# Altium PCB PCB.PcbDoc (part 8 of 9)
Units mil, origin at the board's own origin, x right, y up, seen from the top; angles counter-clockwise.
Board outline 4330.71 x 3149.61 mil, 8 copper layers (L1_TOP, L2_GND, L3_SIG, L4_PWR, L5_PWR, L6_SIG, L7_GND, L8_BOT), stack 62.406 mil thick; 660 components, 433 nets, 2602 pads, 1254 vias.
Unrouted connection lines stored in the file: 930.
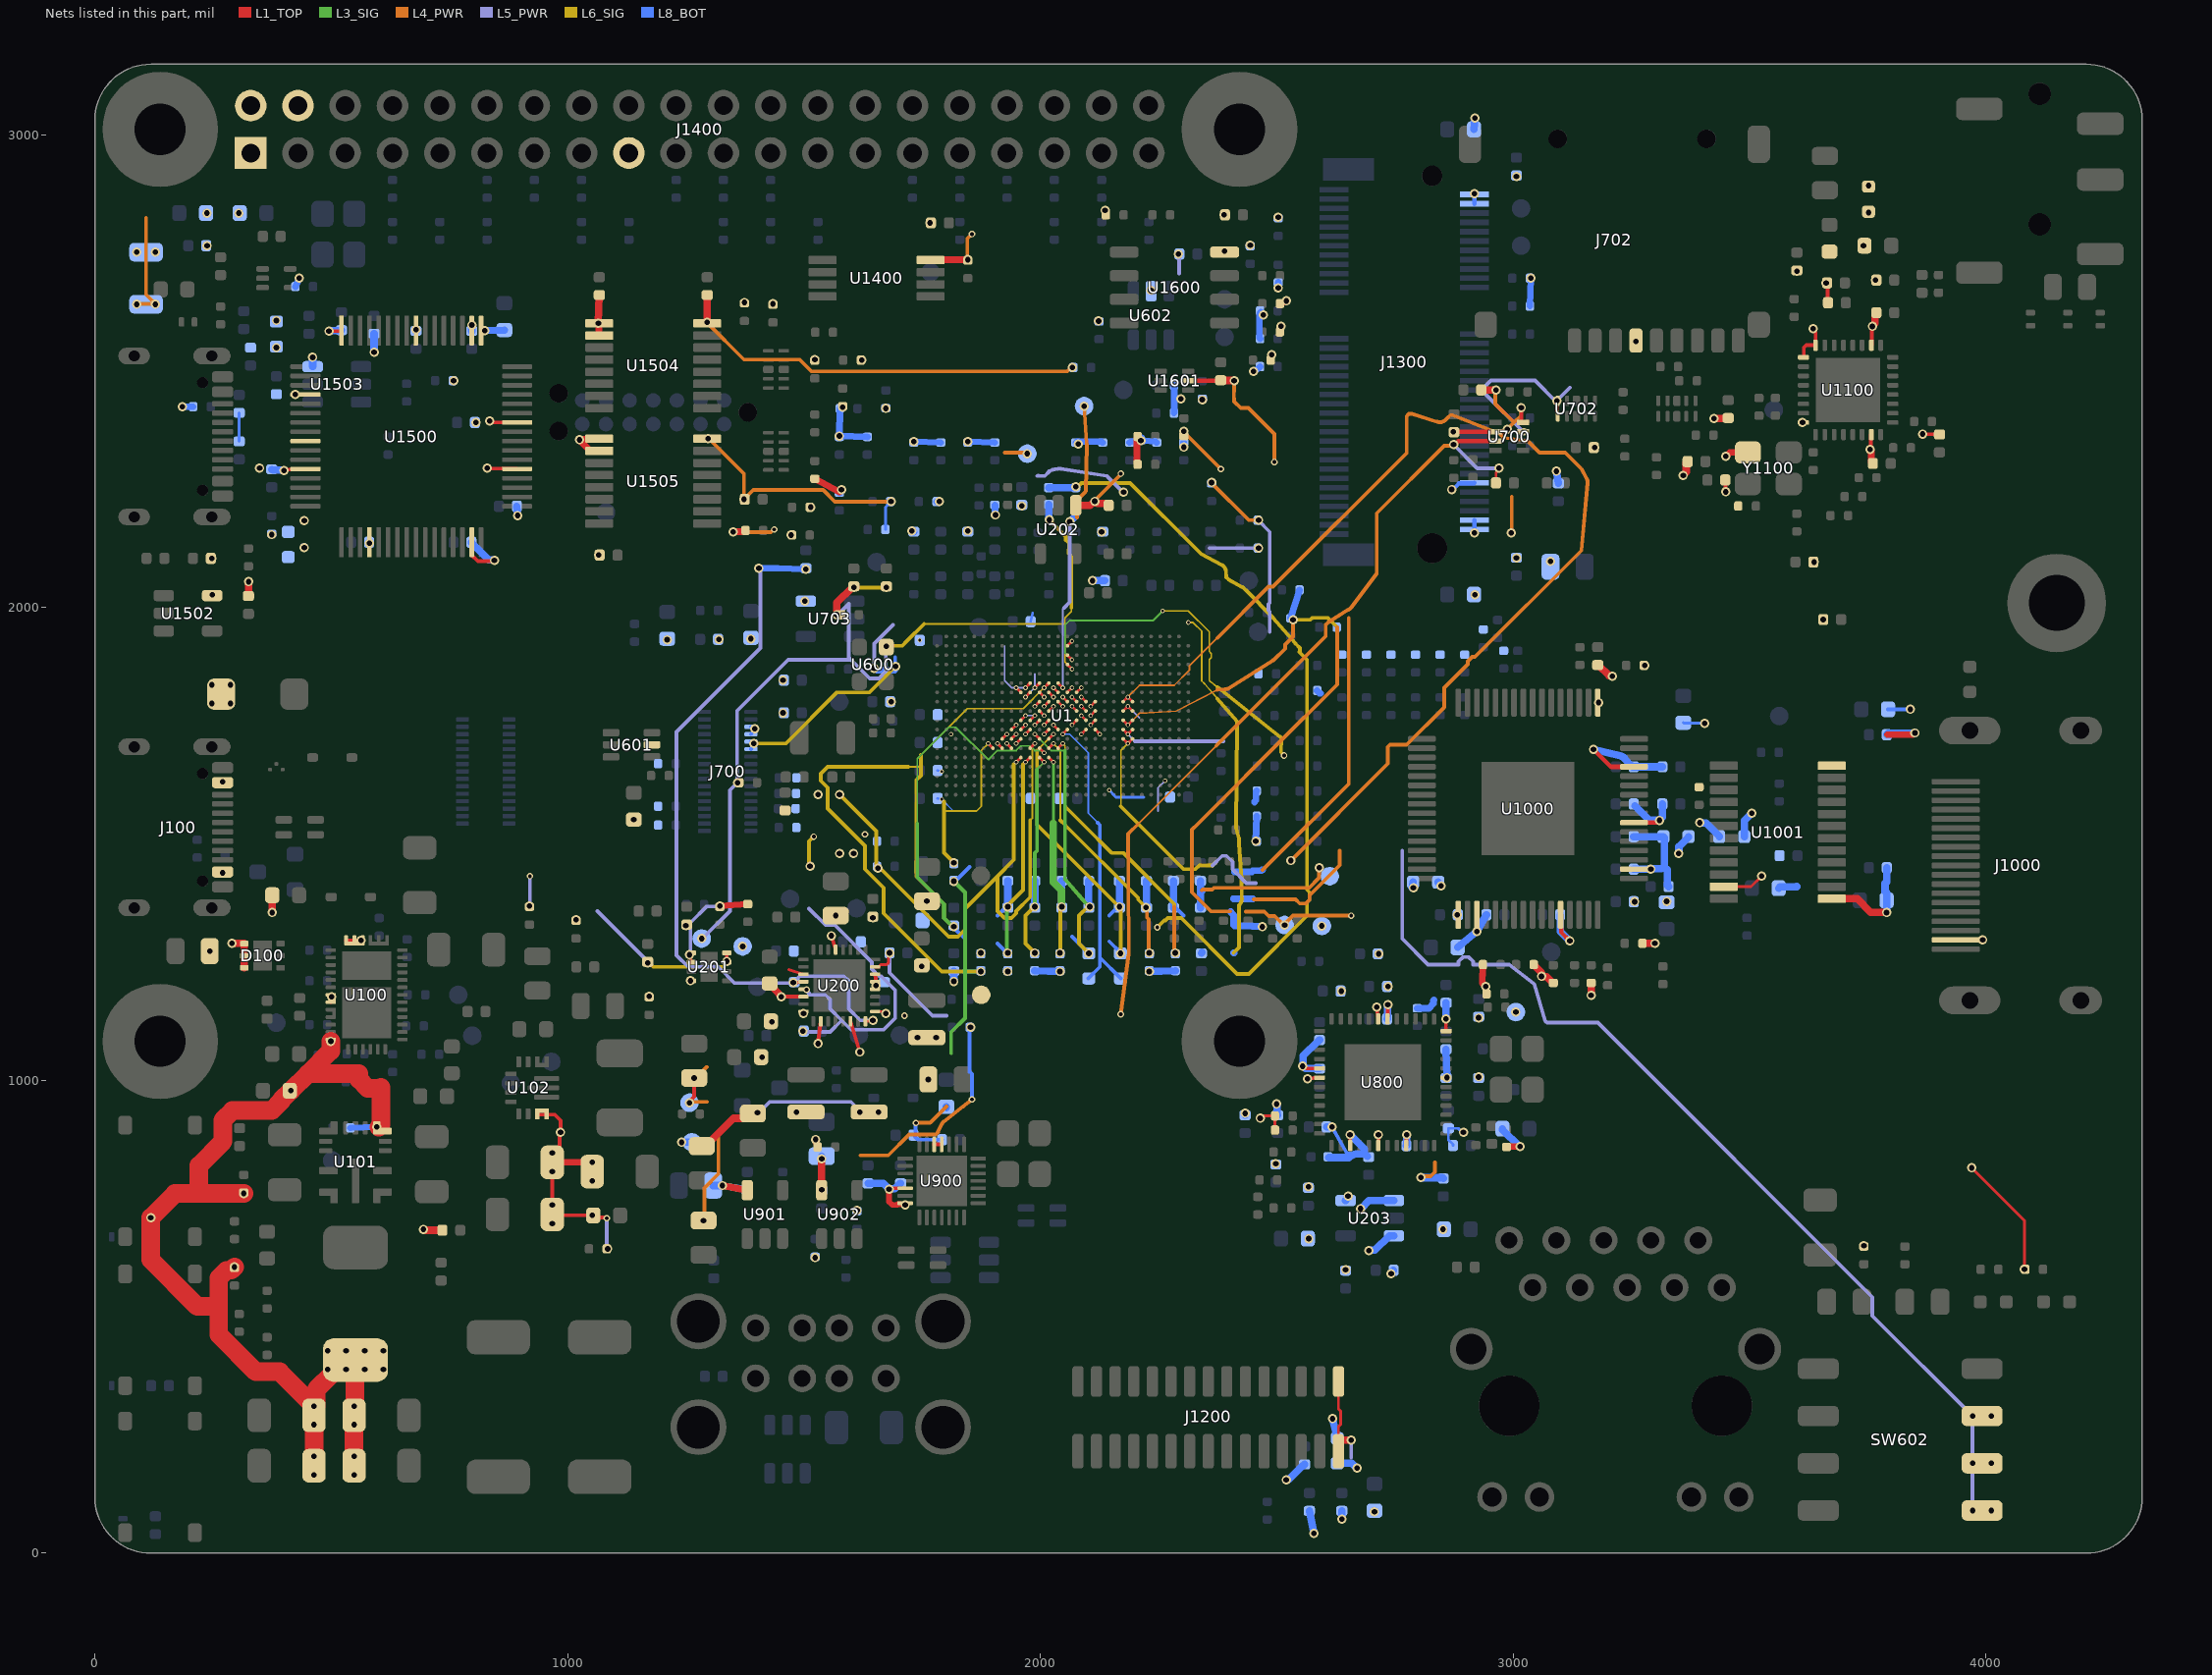
[diagram p11: the nets of this part, all layers, seen from the top]

## Via types
v1: diameter 19.68, hole 11.81, L1_TOP to L8_BOT, 865 vias
v2: diameter 9.84, hole 5.91, L1_TOP to L8_BOT, 246 vias
v3: diameter 15.75, hole 7.87, L1_TOP to L8_BOT, 125 vias
v4: diameter 13.78, hole 7.87, L1_TOP to L8_BOT, 18 vias

## Nets (pads, with @x,y where several pads share a name; then routed paths per layer and width w, separated by ;. In a path a pad name is that pad's centre, name@x,y a point inside that pad or via, vN(x,y) a via of type N, cw(c..) or ccw(c..) an arc to the next point about the centre after c; other vN are vias at no path point) (continued)
VBUS_USBC: C100.1 C101.1 D100.4 D100.5 D100.6 D103.2 J100.A4B9 J100.B4A9 R902.1 U100.23 U100.24 U100.25 U100.32 U100.33 | length 211.7
  L1_TOP w7.87: U100.33@499.02,1165.35 v1(500.98,1177.17) ; U100.32@499.02,1181.1 v1(500.98,1177.17) ; U100.32@505.91,1173.23 v1(500.98,1177.17) ; U100.25@531.5,1296.26 v1(562.99,1296.26) ; U100.24@549.21,1289.37 v1(562.99,1296.26) ; U100.24@549.21,1296.26 v1(562.99,1296.26) ; U100.23@566.93,1296.26 v1(562.99,1296.26)
  L1_TOP w15.75: v1(270.08,1438.98) J100.B4A9@270.08,1440.94 ; J100.A4B9@270.08,1629.92 v1(270.08,1631.89) ; v1(290,1290) 290.31,1289.69 315.63,1289.69 D100.4@315.95,1289.37 D100.6@315.95,1238.19 ; v1(375,1355) 375.1,1355.1 375.1,1391.63 C101.1@375.2,1391.73
  L8_BOT w14.17: v1(270.08,1438.98) R902.1@275.59,1441.93
  other v1: 242.91,1273.62 247.44,1797.24 286.81,1797.24 247.44,1836.61 286.81,1836.61
VCC_3V3_CAM: C1200.1 C1201.1 C1202.1 FB1200.2 J1200.15 | length 324.1
  L1_TOP w5.94: J1200.15@2630.59,215.43 2630.59,267.89 2634.86,272.16 2634.86,300.84 2630.59,305.1 J1200.15@2630.59,363.07
  L1_TOP w15.75: J1200.15@2637.8,239.17 v1(2657.48,239.17)
  L5_PWR w7.87: 2657.48,201.77 v1@2657.48,241.14
  L8_BOT w15.75: C1201.1@2568.9,89.37 v1(2578.74,42.13) ; FB1200.2@2627.95,189.96 2658.97,189.96 2668.93,180 v1(2670,180) ; v1(2637.8,71.85) C1202.1@2637.8,89.37 ; v1(2706.69,87.8) C1200.1@2706.69,89.76
VCC_3V3_DBG: C1504.1 C1505.1 C1510.1 C1511.1 C1512.1 C1513.1 C1514.1 C1521.1 C1522.1 C1524.1 FB1500.1 FB1501.1 R1504.1 R1505.1 R1508.1 R1509.1 R1510.1 U1500.20 U1500.31 U1500.42 U1500.50 U1500.56 U1502.5 U1503.6 U1504.1 U1504.2 U1505.1 U1505.2 | length 570.2
  L1_TOP w7.87: v1(580.71,2136.34) U1500.20@580.71,2138.29 ; U1500.56@679.13,2586.12 v1(679.13,2588.07) ; U1500.31@797.24,2138.29 797.24,2111.22 810.04,2098.43 843.43,2098.43 v1(845,2100) ; U1500.50@797.24,2586.12 v1(797.24,2597.91) ; v1(835,2395) 838.2,2395 841.46,2391.73 U1500.42@893.21,2391.73
  L1_TOP w14.17: U1505.2@1066.93,2331.69 1046.71,2333.29 1044.66,2333.29 1044.49,2333.47 1044.49,2335.51 v1(1025,2355) 1026.05,2356.05 1065.7,2356.05 U1505.1@1066.93,2357.28 ; U1504.2@1066.93,2575.79 v1(1064.96,2601.38) U1504.1@1066.93,2601.38 ; R1505.1@1374.02,2643.7 v1(1374.02,2645.67)
  L1_TOP w15.75: C1505.1@245.28,2104.33 v1(247.24,2104.33) ; U1502.5@248.03,2025.59 v1(248.03,2027.56) ; C1504.1@324.8,2024.8 324.9,2024.9 324.9,2054.9 v1(325,2055) ; v1(1064.96,2601.38) C1522.1@1066.93,2661.22 ; v1(1065.75,2111.22) C1524.1@1067.72,2111.22
  L8_BOT w14.17: v1(185,2425) 185.1,2425.1 207.58,2425.1 R1509.1@207.68,2425.2 ; v1(374.02,2154.53) R1504.1@374.02,2156.5 ; R1508.1@424.21,2679.13 v1(432.09,2696.85) ; R1510.1@756.89,2480.32 v1(758.86,2480.32)
  L8_BOT w15.75: FB1500.1@383.86,2605.31 v1(383.86,2607.28) ; v1(442.91,2126.97) v1@442.91,2128.94 ; U1503.6@460.63,2509.84 v1(460.63,2529.53) ; C1511.1@579.92,2138.27 v1(580.71,2136.34) ; v1(590.55,2540.16) C1521.1@590.55,2579.53 ; C1514.1@679.13,2585.35 v1(679.13,2588.07) ; C1512.1@796.46,2138.27 796.46,2137.09 832.79,2100.75 844.25,2100.75 v1(845,2100) ; C1510.1@797.24,2585.35 v1(797.24,2597.91) ; C1513.1@803.86,2391.73 v1(805.83,2391.73)
VCC_3V3_FTPHY: C1515.1 C1516.1 FB1500.2 U1500.4 | length 21.7
  L1_TOP w7.87: v1(423.7,2450.79) U1500.4@445.37,2450.79
  other v1: 383.86,2550.2
VCC_3V3_FTPLL: C1517.1 C1518.1 FB1501.2 U1500.9 | length 60.6
  L8_BOT w5.91: C1518.1@305.12,2351.57 C1517.1@305.12,2412.2
  other v1: 442.91,2184.06 348.43,2295
VCC_3V3_MAIN: C104.1 C114.1 C117.1 C118.1 C119.1 C120.1 C200.1 C201.1 C202.1 C203.1 C204.1 C205.1 C207.1 C209.1 C222.1 L100.2 R117.1 R119.1 R120.1 R121.1 R122.1 R200.1 R201.1 R205.1 R209.1 TP302.1 U100.38 U101.1 U200.4 U200.5 U200.6 U200.13 U200.22 U200.26 U200.30 U201.1 U201.2 U201.4 | length 2694.6
  L1_TOP w5.91: U200.4@1650.59,1192.91 v1(1652.56,1200.79)
  L1_TOP w7.87: v1(1259.84,1210.63) U201.4@1261.81,1210.63 ; U201.2@1261.81,1250 v1(1257.87,1265.75) U201.1@1261.81,1269.68 ; v1(1451.77,1177.17) U200.22@1499.02,1177.16 ; v1(1529.53,1077.76) U200.26@1535.43,1125 ; v1(1557.7,1306.1) U200.13@1566.93,1276.57 ; U200.30@1598.43,1125 v1(1618.11,1060.04) ; U200.5@1650.59,1208.66 v1(1652.56,1200.79) U200.6@1650.59,1224.41
  L1_TOP w14.17: R122.1@1017.72,1337.6 v1(1017.72,1339.57) ; R121.1@1172.24,1176.18 v1(1172.24,1178.15) ; R201.1@1321.85,1367.13 v1(1321.85,1369.09) R205.1@1380.91,1373.03 ; v1(1524.61,875) R209.1@1528.54,859.25
  L1_TOP w15.75: v1(695,685) 696.07,685 697.99,683.07 C114.1@735.04,683.07 ; v1(1250,1327.56) C222.1@1251.97,1329.53 ; C207.1@1409.25,1049.21 v1(1411.22,1049.21) ; C203.1@1427.16,1204.92 v1(1451.77,1177.17) ; C202.1@1429.92,1125 1430.91,1124.02 v1(1431.89,1124.02) ; v1(1645.67,1344.29) C204.1@1645.67,1346.26 ; v1(1749.02,1241.34) C200.1@1749.02,1243.31
  L1_TOP w39.37: v1(295.28,605.32) 288.39,598.43 278.24,598.43 261.81,581.99 261.81,522.15 ; v1(314.96,760.83) 220,760.83 ; C119.1@463.58,185.04 v1(463.58,271.65) ; v1(463.58,311.02) 390.75,383.86 340.25,383.86 261.81,462.3 261.81,522.15 ; C117.1@468.5,311.02 468.5,346.56 L100.2@501.42,379.48 ; v1(499.02,1082.68) 499.02,1062.51 450.75,1014.25 ; C120.1@548.23,185.04 v1(548.23,271.65) ; C118.1@548.23,291.34 549.7,292.82 549.7,406.99 L100.2@551.18,408.46 ; U101.1@600.39,901.57 605,906.18 605,985.46 603.05,983.5 576.95,983.5 558.5,1001.95 558.5,1014.25 450.75,1014.25 ; 220,760.83 169.29,760.83 v1(118.11,709.65) 118.11,620.52 216.49,522.15 261.81,522.15 ; 220,760.83 220,820 270.67,870.67 270.67,916.12 290.71,936.17 374.05,936.17 394.09,956.21 394.09,958.27 v1(414.17,978.35) 414.85,978.35 450.75,1014.25
  L5_PWR w7.87: v1@1259.84,1264.76 1259.84,1333.66 1294.29,1368.11 v1@1323.82,1368.11
  L8_BOT w14.17: R200.1@118.11,707.68 v1(118.11,709.65) ; R120.1@540.35,899.61 v1(596.46,901.57)
  L8_BOT w15.75: v1(1241.14,869.09) TP302.1@1262.8,869.09
  other v1: 463.58,165.35 548.23,165.35 463.58,204.72 548.23,204.72 548.23,311.02 492.13,388.78 531.5,388.78 570.87,388.78 610.24,388.78 492.13,428.15 531.5,428.15 570.87,428.15 610.24,428.15 1566.93,1348.62
  other v4: 1712.6,1136.81
VCC_3V3_SYS: C223.1 C224.1 C225.1 C608.1 C700.1 C701.1 C710.1 C712.1 C803.1 C804.1 C805.1 C806.1 C807.1 C808.1 C809.1 C810.1 C900.1 C901.1 C902.1 C903.1 C904.1 C1015.1 C1016.1 C1107.1 C1108.1 C1114.1 C1115.1 C1203.1 C1300.1 C1301.1 C1302.1 C1303.1 C1304.1 C1404.1 C1406.1 C1407.1 C1523.1 C1525.1 C1600.1 C1601.1 FB311.1 FB1000.1 FB1001.1 FB1002.1 FB1100.1 FB1200.1 J700.22 J700.23 J1300.2 J1300.4 J1300.72 J1300.74 J1400.1 J1400.17 R108.1 R202.1 R204.1 R208.1 R210.1 R604.1 R607.1 R608.1 R609.1 R610.1 R620.1 R622.1 R624.1 R626.1 R628.1 R630.1 R632.1 R634.1 R636.1 R638.1 R640.1 R642.1 R651.1 R731.1 R813.1 R814.1 R820.1 R822.1 R908.1 R909.1 R1002.1 R1007.1 R1012.1 R1013.1 R1014.1 R1015.1 R1016.1 R1100.1 R1101.1 R1106.1 R1200.1 R1201.1 R1428.1 R1429.1 R1430.1 R1431.1 R1432.1 R1433.1 R1511.1 R1512.1 R1513.1 R1514.1 R1515.1 R1516.1 R1517.1 R1518.1 R1522.1 R1523.1 R1524.1 R1525.1 R1526.1 R1527.1 R1529.1 R1600.1 R1603.1 R1604.1 R1605.1 R1606.1 R1607.1 SW602.1 SW602.2 SW602.3 TP303.1 U1.B15 U1.F11 U1.F12 U1.G10 U1.G11 U1.J21 U1.J22 U1.L21 U1.L22 U1.M21 U1.M22 U201.7 U201.8 U202.1 U602.5 U700.2 U700.8 U800.19 U800.30 U800.41 U900.18 U900.19 U900.26 U900.28 U1001.24 U1100.7 U1400.8 U1504.16 U1505.16 U1600.8 U1601.5 Y1100.4 | length 12359.6
  L1_TOP w5.91: v2(1948.82,1830.71) U1.G10@1958.66,1820.87 ; v2(1968.5,1811.02) U1.G11@1978.35,1820.87 ; v2(1968.5,1830.71) U1.F11@1978.35,1840.55 ; v2(1988.19,1830.71) U1.F12@1998.03,1840.55 ; U1.B15@2057.09,1919.29 v2(2066.93,1929.13) ; U1.M21@2175.2,1722.44 v2(2185.04,1712.6) U1.M22@2194.88,1722.44 ; U1.L21@2175.2,1742.13 v2(2185.04,1732.28) U1.L22@2194.88,1742.13 ; U1.J21@2175.2,1781.5 v2(2185.04,1791.34) U1.J22@2194.88,1781.5 ; v1(2465,920) 2468.73,920 2473.73,925 R814.1@2496.3,925 R822.1@2496.3,895
  L1_TOP w7.56: v1(2555,1030) 2558.28,1030 2562.69,1025.59 U800.41@2590.55,1025.59 ; U800.30@2734.25,1129.92 2735,1137.95 v1(2735,1160) ; U800.19@2858.27,1005.91 v1(2860.24,1005.91)
  L1_TOP w7.87: U201.7@1336.61,1250 v1(1336.61,1251.97) U201.8@1336.61,1269.68 ; v1(1680,770) 1681.65,771.65 U900.26@1714.08,771.65 ; U900.19@1775.59,864.67 U900.18@1791.34,864.67 ; v1(3017.32,2423.23) 3017.32,2393.7 3019.29,2391.73 U700.8@3021.26,2391.73 ; v1(3755,2335) 3756.89,2336.89 3756.89,2365.16 U1100.7@3757.87,2366.14 ; v1(3866.14,2367.32) 3866.61,2366.85 3901.5,2366.85 C1108.1@3901.97,2366.38
  L1_TOP w9.45: U1601.5@2312.6,2480.32 2380.71,2480.32 C1601.1@2381.5,2481.1 ; v1(2873.62,2372.05) U700.2@2962.99,2372.05 2964.17,2373.23 2980.69,2373.23 2984.69,2377.23 v1(2987.46,2377.23)
  L1_TOP w12: v1(1680,770) 1680,743.54 1687.03,736.51 1696.97,736.51 1698.56,738.09 U900.28@1703.84,738.09
  L1_TOP w14.17: U1505.16@1295.28,2357.28 v1(1297.24,2357.28) ; U1504.16@1295.28,2601.38 v1(1295.28,2603.35) ; v1(1350,2160) 1351.05,2161.05 1374.53,2161.05 1376.3,2162.83 R1525.1@1376.3,2163.39 ; R1526.1@1434.37,2640.75 v1(1434.37,2642.72) ; v1(1472.76,2153.54) R1522.1@1474.72,2153.54 ; R1524.1@1512.13,2212.6 v1(1514.09,2212.6) ; R1523.1@1522.95,2272.64 1574.8,2245.08 v1(1579.19,2249.47) ; R1527.1@1522.95,2522.64 v1(1522.95,2524.61) ; v1(1582.01,2424.21) R1529.1@1582.01,2426.18 ; R604.1@1620.39,2523.62 v1(1622.36,2523.62) ; U1400.8@1767.72,2735.24 1768.7,2736.22 v1(1846.46,2736.22) ; v1(2136.81,2840.75) R1600.1@2138.78,2830.91 ; R1101.1@2205.71,2303.15 2204.05,2305.91 R1100.1@2204.05,2352.93 ; R1100.1@2205.71,2362.2 2204.05,2359.45 R1100.1@2204.05,2352.93 ; v1(2212.72,2353.22) R1100.1@2204.05,2352.93 ; R1604.1@2303.54,2363.19 v1(2303.54,2373.03) ; R1606.1@2487.2,2523.43 v1(2489.17,2535.24) ; R1605.1@2506.89,2583.27 v1(2508.86,2595.08) ; R1603.1@2506.89,2643.11 v1(2520.67,2649.02) ; R1014.1@2936.3,1245 2936.17,1242.24 2934.82,1212.42 2934.82,1206.61 v1(2941.93,1198.82) R1012.1@2943.9,1183.07 ; R813.1@2986.22,859.25 2986.97,860 v1(3015,860) ; R1013.1@3276.57,1877.95 v1(3278.54,1877.95) ; v1(3450,2320) 3458.46,2328.46 Y1100.4@3496.69,2328.46 ; R1607.1@3742.13,648.62 v1(3742.13,650.59) ; v1(3755,2335) 3755,2333.51 3757.56,2330.95 3757.56,2308.54 C1107.1@3761.1,2305 ; 3791.34,1731.3 3844.81,1731.3 3848.51,1735 v1(3850,1735)
  L1_TOP w15.75: v1(1169.29,1248.82) C224.1@1169.29,1250.79 ; v1(1295.28,2603.35) C1523.1@1295.28,2661.22 ; v1(1372.83,2229.33) C1525.1@1374.8,2229.33 ; v1(1766.54,2813.98) C1404.1@1768.5,2813.98 ; U202.1@2074.8,2216.54 2105.47,2216.54 2113.93,2225 2116.07,2225 2120.59,2220.47 2141.73,2220.47 2144.49,2217.72 C225.1@2144.49,2216.53 ; C1601.1@2381.5,2481.1 2382.05,2480.55 2409.45,2480.55 v1(2410,2480) ; v1(2388.58,2830.91) C1600.1@2390.55,2830.91 ; U1600.8@2389.76,2752.16 v1(2389.76,2754.13) ; C712.1@2932.68,2460.63 v1(2964.17,2460.63) ; R1015.1@3043.7,1245 3043.7,1244.02 3059.25,1228.47 3059.25,1220.75 v1(3060,1220) 3060.75,1219.25 3071.07,1219.25 3084.02,1206.3 R1016.1@3085,1206.3 ; v1(3165,1180) R1007.1@3165,1206.3 ; R1002.1@3273.7,1290 v1(3300,1290) ; C1115.1@3635.04,2096.46 v1(3637.01,2096.46) ; C1114.1@3654.13,1975 v1(3656.1,1975) ; FB1100.1@3751.97,2890.75 v1(3751.97,2892.72) ; v1@3866.14,2365.35 v1(3866.14,2367.32)
  L3_SIG w7.87: 1811.02,1058.07 1811.02,1102.36 1840.55,1131.89 1840.55,1397.64 v1@1815.94,1422.24
  L4_PWR w7.87: v1@1294.29,2603.35 1373.03,2524.61 1491.14,2524.61 1515.75,2500 2057.09,2500 v1@2066.93,2509.84 ; v1@1299.21,2357.28 1373.03,2283.46 1373.03,2229.33 1392.72,2249.02 1540.35,2249.02 1564.96,2224.41 v1@1683.07,2224.41 ; v1(1350,2160) 1430.06,2160 1435.41,2165.35 v4(1437.01,2165.35) ; v4(1736.81,910.04) 1737.2,910.43 1766.73,910.43 1801.18,944.88 ; v1@1845.47,2736.22 1845.47,2780.51 v4(1855.32,2790.35) ; v1(2115,2225) 2115,2226.59 2170.28,2281.87 v4(2170.28,2283.46) ; v1@2303.15,2372.05 v4(2381.89,2293.31) ; v1@2362.2,2263.78 2440.94,2185.04 v1@2460.63,2185.04 ; v1(2410,2480) 2410,2457.27 2409.25,2456.52 2409.25,2443.48 2410,2442.73 2410,2436.14 2423.71,2422.43 2439.77,2422.43 2495.08,2367.13 v4(2495.08,2308.07) ; 2434.76,1357.28 2473.85,1357.28 2473.85,1357.18 2483.07,1347.95 2495.55,1347.95 2514.76,1328.74 2534.45,1348.43 v4(2657.48,1348.43) ; 2450.79,1382.87 2539.76,1382.87 2548.38,1374.25 2561.52,1374.25 2569.25,1381.98 2569.25,1391.52 2632.87,1455.14 2632.87,1486.22 ; 2470,1445 2492.13,1467.13 2652.56,1627.56 2652.56,1978.35 ; v1@2962.6,2460.63 2962.6,2431.1 3001.97,2391.73 ; v1(2987.46,2377.23) 3001.97,2391.73 ; v1@3016.73,2421.26 3016.73,2406.5 3001.97,2391.73
  L5_PWR w3.54: 1924.21,1919.29 1924.21,1845.47 1938.98,1830.71 v2(1948.82,1830.71) v2(1968.5,1830.71) ; v2(1968.5,1811.02) v2(1988.19,1830.71) 1988.19,1860.24 ; v2(2185.04,1732.28) 2199.8,1717.52 ; v2(2185.04,1791.34) 2209.65,1766.73
  L5_PWR w7.87: 1062.99,1358.27 v1@1171.26,1250 ; v1@1648.62,1870.08 1648.62,1924.21 1687.99,1963.58 ; 1993.11,2278.54 1995.36,2279.44 1996.34,2278.47 2009.38,2278.47 2018.61,2287.69 2018.61,2288.75 2025.44,2291.48 cw(c2032.02,2275.04) 2030.15,2292.65 2035,2293.17 cw(c2040.71,2276.4) 2043.48,2293.9 2140.75,2278.54 2143.05,2276.24 v1@2175.2,2244.09 ; 2199.8,1717.52 2376.97,1717.52 2386.81,1717.52 ; 2293.31,2706.69 v1@2293.31,2746.06 ; 2357.28,2125.98 v1@2460.63,2125.98 ; 2364.3,1454.83 2384.33,1474.86 2393.92,1474.86 2406.5,1462.28 2406.5,1446.85 2436.02,1417.32 2455.71,1417.32 ; v1@2460.63,2185.04 2485.24,2160.43 2485.24,2118.11 2485.24,2009.56 2482.78,2007.11 2482.78,1994.06 2485.24,1991.6 2485.24,1948.82 ; 2765.75,1486.22 2765.75,1299.21 2819.88,1245.08 2884.25,1245.08 2884.25,1251.52 2893.48,1260.75 2906.52,1260.75 2915.75,1251.52 2915.75,1245.08 2992.13,1245.08 3042.44,1205.75 3042.81,1205.46 3044.55,1203.72 3068.07,1125.75 3069.47,1124.35 3071.78,1122.05 3179.13,1122.05 3759.84,541.34 3759.84,501.97 v1@3971.46,290.35 ; v1@4010.83,88.58 3971.46,88.58 v1@3971.46,191.93 ; v1@4010.83,191.93 v1@3971.46,191.93 ; v1@4010.83,290.35 v1@3971.46,290.35 ; v1@3971.46,191.93 v1@3971.46,290.35
  L6_SIG w3.54: 2170.28,1579.72 2170.28,1697.83 v2(2185.04,1712.6) ; v2(2312.99,1968.5) 2322.83,1968.5 2341.2,1950.14 2341.2,1845.13 2347.24,1839.1 cw(c2344.73,1836.59) 2347.32,1839 2347.52,1838.79 cw(c2344.93,1836.37) 2347.63,1838.67 2374.02,1808.07
  L6_SIG w7.87: v1@1171.26,1250 1181.1,1240.16 1328.74,1240.16 v1@1338.58,1250 ; v1@1392.72,1712.6 v1(1393.7,1712.6) 1461.61,1712.6 1569.88,1820.87 1638.78,1820.87 v1@1692.91,1875 ; 2170.28,1579.72 2303.15,1446.85 2328.14,1446.85 2336.12,1454.83 2364.3,1454.83 ; 2374.02,1808.07 2416.28,1759.06 2416.28,1752.87 2414.25,1535.15 ccw(c2430,1535) 2414.5,1532.23 ; 2408.46,1269.68 2420,1281.22 2420,1370.41 ccw(c2408.46,1383.86) 2426.18,1384.15 2425.5,1425.13 2425.49,1425.2 2420.03,1501.11 2420.05,1504.31 2420.37,1507.38 ccw(c2404.71,1509) 2419.71,1513.8 2415.37,1527.36 2414.5,1532.22
  L8_BOT w5.91: R210.1@1672.24,2165.35 1672.24,2212.78 1683.87,2224.41 v1(1684.06,2224.41)
  L8_BOT w7.87: J700.23@1387.8,1700.79 v1(1393.7,1712.6) J700.22@1387.8,1716.54 ; v1@1692.91,1875 1692.91,1894.68 ; C904.1@1731.5,883.9 1738.08,877.31 1738.52,877.31 1741.34,874.49 C903.1@1792.13,874.49 ; C904.1@1731.5,884.33 1735.68,888.52 1735.68,908.91 v4(1736.81,910.04) ; FB311.1@1815.94,1422.24 1816.93,1422.24 1820.87,1422.24 1850.39,1451.77 ; 2406.5,1382.87 2406.5,1387.8 ; C1016.1@3793.35,1785 v1(3840,1785)
  L8_BOT w9.45: v1(2918.5,2158.25) J1300.72@2918.5,2185.04 ; J1300.4@2918.5,2854.33 v1(2918.5,2875.98)
  L8_BOT w14.17: v1(1523.62,625) R908.1@1523.62,626.97 ; R610.1@1574.8,2243.11 1575.79,2243.11 1577.56,2244.88 1577.56,2246.34 1579.19,2247.98 v1(1579.19,2249.47) ; R1428.1@1574.8,2361.22 v1(1574.8,2363.19) ; R1430.1@1575.79,2421.26 v1(1574.8,2363.19) ; R909.1@1612.2,723.42 v1(1612.2,725.39) ; R1429.1@1633.86,2361.22 v1(1574.8,2363.19) ; v1(1648.62,1872.05) 1654.53,1868.11 1691.93,1868.11 v1(1693.9,1875.98) ; v1(1673.23,2421.58) R1431.1@1673.23,2422.24 ; R1515.1@1732.28,2349.41 v1(1732.28,2351.38) R1516.1@1789.37,2349.41 ; R108.1@1780.51,2224.41 v1(1786.57,2224.41) ; R1517.1@1846.46,2349.41 v1(1846.46,2351.38) R1518.1@1903.54,2349.41 ; v1(2067.91,2507.87) R608.1@2069.88,2507.87 ; R1511.1@2074.8,2349.41 2077.35,2351 R1511.1@2080.5,2351.18 ; v1(2080.32,2345.86) 2080.32,2351 R1511.1@2080.5,2351.18 ; v1(2123.13,2606.4) R607.1@2124.02,2605.31 ; R1512.1@2131.89,2349.41 2129.13,2351.18 R1511.1@2080.5,2351.18 ; R1513.1@2188.98,2349.41 2191.73,2351.18 v1(2212.72,2353.22) ; v1@2214.46,2358.96 v1(2212.72,2353.22) ; R1514.1@2246.06,2349.41 2243.31,2351.18 2219.28,2353.22 v1(2212.72,2353.22) ; R609.1@2282.48,2411.42 2283.51,2414.17 2283.51,2442.32 ; R202.1@2282.48,2470.47 2283.51,2467.72 2283.51,2442.32 ; v1(2296.88,2441.87) 2286.01,2441.87 2283.51,2442.32 ; v1(2303.15,2339.57) R1433.1@2303.15,2349.41 ; v1(2342.52,2439.96) R731.1@2342.52,2441.93 ; R1201.1@2362.2,2262.79 v1(2362.2,2264.76) ; 2408.46,1269.68 2410.43,1269.68 ; 2408.46,1383.86 2410.43,1383.86 2447.83,1383.86 2449.8,1383.86 ; 2410.43,1440.95 2447.83,1440.95 2447.83,1441.93 2449.61,1443.7 2467.21,1443.7 2468.51,1445 2470,1445 ; 2453.06,1588.25 2453.06,1589.74 2455.91,1592.59 2455.91,1610.43 R624.1@2457.68,1612.2 ; R620.1@2457.68,1505.91 v1(2455.71,1505.91) R622.1@2457.68,1559.05 ; R204.1@2459.65,2125.98 v1(2461.61,2125.98) ; R1200.1@2459.65,2185.04 v1(2461.61,2185.04) ; R651.1@2585.63,1824.8 2585.63,1823.82 2590.84,1818.61 R651.1@2592.3,1818.61 ; R820.1@2797.24,1152.56 2821.85,1152.56 2831.64,1162.35 2831.64,1169.26 2832.7,1170.32
  L8_BOT w15.75: C1407.1@235.43,2765.75 v1(237.4,2765.75) ; v1(304.33,2834.65) C1406.1@306.3,2834.65 ; v1(1210.63,1932.28) C700.1@1210.63,1934.25 ; C701.1@1318.11,1933.07 v1(1320.08,1933.07) ; C901.1@1635.35,782.28 1667.72,782.28 v1(1680,770) 1680.75,770.75 1691.54,770.75 1703.07,782.28 C900.1@1704.25,782.28 ; C902.1@1801.18,942.6 C902.1@1801.18,944.57 ; v1(1816.93,1421.26) 1816.93,1422.24 FB311.1@1816.93,1423.23 ; U602.5@2234.25,2669.29 v1(2234.25,2671.26) ; v1(2292.13,2748.03) C608.1@2294.09,2748.03 ; v1(2520,155) 2520.75,155.75 2525.83,155.75 2555.12,185.04 2556.3,185.04 C1203.1@2559.05,187.8 ; C810.1@2590.55,1024.8 2561.26,1024.8 2556.07,1030 v1(2555,1030) 2555.75,1030.75 2555.75,1051.82 2586.61,1082.68 2587.8,1082.68 C809.1@2590.55,1085.43 ; v1(2618.11,284.45) FB1200.1@2627.95,243.11 ; C808.1@2733.46,1129.92 2734.25,1130.7 2734.25,1159.25 v1(2735,1160) ; C807.1@2733.46,1198.82 v1(2735.43,1198.82) ; FB1000.1@2788.39,1419.29 2786.75,1407.81 2787.07,1407.48 v1(2789.05,1407.48) ; C806.1@2858.27,1005.12 v1(2860.24,1005.91) C805.1@2858.27,1065.75 ; C1303.1@2917.32,2027.56 v1(2919.29,2027.56) ; C1301.1@2917.32,3011.81 v1(2919.29,3035.43) ; C804.1@2927.16,1005.12 v1(2927.17,1007.09) ; C803.1@2977.56,897.64 2977.56,895.87 3013.43,860 v1(3015,860) ; v1(3007.09,2105.2) C1304.1@3007.09,2105.51 ; v1(3007.09,2912.2) C1302.1@3007.09,2914.17 ; v1(3350,1480) 3350.75,1480.75 3350.75,1494.45 3371.06,1514.76 FB1001.1@3371.06,1515.75 ; FB1002.1@3489.17,1515.75 3489.17,1549.17 v1(3505,1565) ; C1015.1@3790.55,1731.3 3790.55,1731.49 3793.31,1734.25 3849.25,1734.25 v1(3850,1735)
  other v1: 3972.44,90.16 4011.81,90.16 3972.44,190.16 4011.81,190.16 3972.44,290.16 4011.81,290.16 1714.09,736.22 3015,860 2516.73,1328.74 1140,1551.65 3078.98,2098.17 2176.18,2244.09
VCC_3V3_TFP_DVDD: C1000.1 C1001.1 C1002.1 C1003.1 C1004.1 FB1000.2 U1000.1 U1000.3 U1000.12 U1000.33 | length 312.2
  L1_TOP w9.45: v1(2881.89,1350.39) U1000.1@2883.86,1350.39 ; v1(2923.23,1314.96) U1000.3@2923.23,1350.39 ; U1000.12@3100.39,1350.39 3101.57,1349.21 3101.57,1313.43 v1(3120,1295) ; U1000.33@3179.13,1799.21 v1(3181.1,1799.21)
  L1_TOP w15.75: C1004.1@3179.13,1878.74 3180.32,1878.74 3203.3,1855.75 3209.25,1855.75 v1(3210,1855)
  L8_BOT w15.75: FB1000.2@2841.54,1419.29 2847.44,1411.42 2847.6,1411.42 v1(2847.68,1411.49) ; v1(2881.89,1350.39) C1001.1@2883.07,1350.39 ; C1000.1@2882.68,1281.5 v1(2923.23,1314.96) C1002.1@2943.7,1350.39 ; C1003.1@3099.61,1350.39 3099.61,1315.39 v1(3120,1295)
VCC_3V3_TFP_PVDD: C1005.1 C1006.1 C1007.1 C1008.1 C1009.1 FB1001.2 U1000.18 | length 279.8
  L1_TOP w9.45: U1000.18@3255.91,1446.85 v1(3291.34,1446.85)
  L8_BOT w15.75: C1008.1@3255.12,1377.95 v1(3257.09,1377.95) ; C1006.1@3255.12,1446.85 v1(3291.34,1446.85) 3292.09,1447.6 3314.26,1447.6 3319.07,1452.41 3320.13,1452.41 ; C1009.1@3255.12,1515.75 FB1001.2@3317.91,1515.75 3320.13,1513.53 3320.13,1452.41 ; C1005.1@3324.8,1376.77 v1(3324.8,1378.74) ; C1007.1@3328.9,1410 3326.14,1412.76 3326.14,1445.34 3320.13,1451.35 3320.13,1452.41
VCC_3V3_TFP_TVDD: C1010.1 C1011.1 C1012.1 C1013.1 C1014.1 FB1002.2 R1008.1 U1000.23 U1000.29 | length 515
  L1_TOP w9.45: v1(3170,1700) 3206.61,1663.39 U1000.29@3255.91,1663.39 ; U1000.23@3255.91,1545.28 3302.51,1545.28 3307.23,1550 v1(3310,1550)
  L8_BOT w5.91: C1010.1@3360,1756.65 3360.83,1755.83 3404.17,1755.83 v1(3405,1755)
  L8_BOT w15.75: v1(3170,1700) 3226.6,1686.54 cw(c3222.64,1669.88) 3235.43,1681.27 3243.14,1672.61 3252.36,1663.39 C1013.1@3255.12,1663.39 C1014.1@3315.75,1663.39 ; C1011.1@3257.87,1580.71 3287.83,1550.75 3309.25,1550.75 v1(3310,1550) 3310,1551.07 3315.75,1556.81 C1012.1@3315.75,1584.65 ; v1(3395,1545) 3395.75,1544.25 3408.51,1544.25 3436.02,1516.73 FB1002.2@3436.02,1515.75
VCC_5V0: C125.1 C126.1 C127.1 C128.1 C905.1 C906.1 C909.1 C910.1 C1017.1 C1018.1 F1400.1 R123.1 R125.1 R301.1 R910.1 R1610.1 TP301.1 U102.7 U102.8 U901.5 U902.5 U1001.11 | length 1683.3
  L1_TOP w5.91: U1001.11@3470,1410 3503.53,1410 v1(3525.88,1432.35) ; v1(3970,815) 4081.69,703.31 v1(4081.69,600.39)
  L1_TOP w7.87: U102.7@936.02,929.13 936.02,928.5 937.01,927.51 954.72,927.51 U102.8@955.71,928.5 ; U102.7@945.87,936.02 954.72,936.02 955.71,935.04 U102.8@955.71,929.13 U102.8@955.71,928.5 ; C127.1@967.52,716.54 969.49,714.57 v1(1052.36,714.57) 1057.14,709.79 1081.55,709.79 v4(1082.68,708.66) ; v1(967.52,736.22) C125.1@967.52,826.77 982.74,841.99 982.74,887.74 v1(985,890) 985,915 972.49,927.51 956.69,927.51 U102.8@955.71,928.5
  L1_TOP w14.17: R125.1@919.29,1367.13 v1(919.29,1369.09) ; C125.1@967.52,826.77 1035.04,826.77 1052.17,809.65 C126.1@1052.17,807.09 ; R123.1@1082.68,643.7 v1(1084.65,643.7)
  L1_TOP w15.75: v1(1327.56,777.56) U901.5@1379.92,767.72 ; U902.5@1537.4,767.72 v1(1537.4,768.9) v1(1537.4,833.86)
  L4_PWR w7.87: 1619.09,841.54 1678.15,841.54 1722.44,885.83 1778.23,885.83 1778.95,885.83 1783.56,890.44 1790.59,906.36 cw(c1805,900) 1795.26,912.37 1836.56,944.88 v4(1855.32,959.65) ; 1924.21,2327.76 v1@1973.43,2327.76
  L5_PWR w7.87: v1@920.28,1368.11 v4(920.28,1432.09) ; v1@1082.68,644.68 v4(1082.68,708.66)
  L8_BOT w7.87: R910.1@1850.39,1112.2 1850.39,1018.7 1855.32,1013.78 v4(1855.32,959.65)
  L8_BOT w14.17: R910.1@1850.39,1112.2 v1(1852.36,1112.2) ; R301.1@1903.54,2217.52 1904.27,2216.79 1904.27,2196.79 v1(1905,2196.06)
  L8_BOT w15.75: C905.1@1307.87,777.56 v1(1327.56,777.56) C906.1@1379.92,768.5 ; C910.1@1537.4,766.93 v1(1537.4,768.9) ; v1(1537.4,833.86) C909.1@1537.4,839.76 ; C1018.1@3561.81,1406.5 3564.56,1409.25 3599.25,1409.25 3600,1410
  other v1: 967.52,696.85 1052.17,787.4 967.52,807.09 1052.17,826.77 967.52,846.46 1972.44,2325.79 88.58,2751.97 127.95,2751.97
VCC_5V0_HDMI: C1019.1 C1020.1 J1000.18 U1001.13 | length 282.9
  L1_TOP w9.45: J1000.18@3936.22,1297.24 v1(3993.31,1297.24)
  L1_TOP w15.75: U1001.13@3674.17,1384.25 3727.75,1384.25 3756.54,1355.47 3789.53,1355.47 v1(3790,1355)
  L8_BOT w15.75: v1(3790,1355) 3790.08,1355.08 3790.08,1380.83 3790.35,1381.1 3790.35,1397.14 3786.88,1400.61 3786.88,1416.92 3790.35,1420.39 3790.35,1445.87 3790.55,1446.06 C1019.1@3790.55,1449.8
VCC_5V0_HDR: C1405.1 F1400.2 J1400.2 J1400.4 | length 231.6
  L4_PWR w7.87: v1@88.58,2642.72 127.95,2642.72 108.27,2662.4 108.27,2824.8
  L8_BOT w15.75: C1405.1@235.04,2834.65 v1(237.01,2834.65)
  other v1: 88.58,2641.73 127.95,2641.73
VDD_1V0_PHY: C228.1 C817.1 C818.1 C819.1 C820.1 C821.1 C822.1 C823.1 C824.1 C825.1 C826.1 TP312.1 U203.5 U800.6 U800.24 U800.31 U800.42 | length 283.2
  L1_TOP w7.56: v1(2564.96,1003.15) 2564.96,1003.94 U800.42@2590.55,1005.91 ; v1(2711.81,1155.36) 2713.62,1137.95 U800.31@2714.57,1129.92 ; v1(2715,885) 2715.51,884.49 U800.6@2715.51,870.24 ; U800.24@2858.27,1104.33 v1(2858.27,1129.92)
  L4_PWR w7.87: v1(2805,795) 2807.26,797.26 2825.93,797.26 2834.65,805.98 2834.65,826.77
  L8_BOT w15.75: C825.1@2433.07,926.38 v1(2433.07,930.32) ; C818.1@2498.03,822.05 v1(2498.03,824.02) ; v1(2500,950) 2500.75,949.25 2500.75,927.59 C826.1@2501.97,926.38 ; C817.1@2565.75,665.35 v1(2567.72,665.35) ; C819.1@2566.93,772.83 v1(2566.93,774.8) ; C824.1@2635.04,1188.98 v1(2637.01,1188.98) ; C228.1@2645.67,597.64 v1(2645.67,599.61) ; U203.5@2645.67,746.06 2651.11,755.14 2651,755.25 v1(2650.92,755.25) ; C823.1@2713.78,1267.72 v1(2715.75,1267.72) ; v1(2805,795) 2805.75,794.25 2850.63,794.25 C820.1@2852.36,792.52 ; v1(2858.27,1129.92) C822.1@2858.27,1164.17 ; v1(2927.17,1132.68) C821.1@2927.16,1134.65
  other v1: 3005.91,1144.49
VDD_1V8: C206.1 C212.1 C213.1 C227.1 C702.1 C703.1 C704.1 C705.1 C1109.1 C1110.1 C1305.1 J700.20 J700.21 J1300.64 L201.2 R701.1 R702.1 R703.1 R704.1 R705.1 R706.1 R707.1 R708.1 R709.1 R710.1 R1305.1 R1306.1 R1307.1 R1308.1 R1309.1 R1311.1 R1317.1 R1319.1 R1322.1 R1323.1 TP308.1 U1.C15 U1.H21 U1.H22 U1.K21 U1.K22 U1.N11 U1.P10 U200.20 U200.32 U203.1 U203.3 U703.5 U1100.32 | length 8656
  L1_TOP w5.91: v2(1948.82,1673.23) U1.P10@1958.66,1683.07 ; U1.N11@1978.35,1702.76 v2(1988.19,1712.6) ; U1.C15@2057.09,1899.61 v2(2066.93,1889.76) ; U1.K21@2175.2,1761.81 v2(2185.04,1751.97) U1.K22@2194.88,1761.81 ; U1.H21@2175.2,1801.18 v2(2185.04,1811.02) U1.H22@2194.88,1801.18
  L1_TOP w7.87: v1(1477.36,1206.69) U200.20@1499.02,1208.66 ; U200.32@1629.92,1125 v1(1645.67,1126.97) ; C1110.1@3448.9,2270 3449.45,2269.45 3449.45,2245.55 v1(3450,2245) ; v1(3612.2,2391.73) U1100.32@3614.17,2391.73
  L1_TOP w15.75: C213.1@1283.47,861.02 1292.13,861.02 1350.97,919.87 1381.68,919.87 C212.1@1391.73,929.92 ; v1(3425,2400) 3425.55,2400.55 3454.45,2400.55 C1109.1@3455,2401.1
  L3_SIG w3.54: v2(2066.93,1889.76) 2052.17,1904.53 2052.17,1963.58 2061.26,1972.68 2238.43,1972.68 2239.17,1973.43 v2(2258.86,1993.11)
  L4_PWR w3.54: v2(2185.04,1751.97) 2207.34,1774.27 2209.65,1776.57 2287.7,1781.1 2374.02,1826.3 ; v2(2185.04,1811.02) 2209.65,1835.63 2283.18,1835.63 2315.19,1867.64 2315.19,1876.91 2374.02,1935.74
  L4_PWR w7.87: 2374.02,1826.3 2391.06,1827.32 ccw(c2390,1845) 2399.44,1830.01 2492.13,1888.41 2492.93,1888.92 2518.01,1912.98 2518.01,1921.66 2534.6,1938.25 v1(2534.6,1974.26) ; 2374.02,1935.74 2482.57,2044.29 2492.13,2044.29 2775,2327.17 2775,2405.39 2777.31,2407.69 2779.61,2410 2786.14,2410 2839.67,2393.1 ccw(c2845,2410) 2857.68,2397.63 2862.72,2402.79 2867.33,2407.4 2871.6,2407.6 2968.79,2368.82 cw(c2962.22,2352.36) 2974.89,2364.75 2980.13,2359.51 3031.5,2352.36 3033.8,2350.06 3056.1,2327.76 3110.24,2327.76 3142.38,2295.61 3144.69,2293.31 3155.53,2273.52 cw(c3140,2265) 3157.64,2263.39 3144.69,2121.06 3142.38,2118.76 2919.37,1895.75 2913.48,1895.75 2904.25,1886.52 2904.25,1880.63 2854.33,1830.71 2854.33,1789.33 2775,1710 2739.61,1710 2735,1705.39 2735,1670 v1(2530,1465) ; 2402.28,1357.58 2361.3,1357.58 2320.77,1398.11 2320.77,1425.2 2320.77,1530.27 2333.81,1543.31 2374.02,1583.51 2492.13,1701.62 2627.95,1837.45 2627.95,1958.66 ; v1(2996.26,2158.25) 2997.05,2159.04 2997.05,2234.25
  L5_PWR w7.87: v1@1402.56,930.12 1427.17,954.72 1599.41,954.72 v1@1619.09,935.04 ; v1@1402.56,2081.69 1407.48,2076.77 1407.48,1914.37 1230.32,1737.2 1230.32,1264.76 1254.92,1240.16 1318.9,1240.16 1353.35,1205.71 1476.38,1205.71 v1(1477.36,1206.69) 1491.14,1220.47 1584.65,1220.47 1594.49,1210.63 1594.49,1151.57 1619.09,1126.97 v1@1643.7,1126.97
  L6_SIG w3.54: 1943.9,1668.31 v2(1948.82,1673.23) ; 1978.35,1550.2 1983.27,1555.12 1983.27,1707.68 v2(1988.19,1712.6) ; v2(2258.86,1993.11) 2312.99,1993.11 2357.28,1948.82 2357.28,1907.31 2361.67,1902.92 2361.67,1894.44 2357.28,1890.05 2357.28,1846.02 2359.59,1843.71 2359.91,1843.39 2374.02,1832.2
  L6_SIG w7.87: v1@1510.83,1451.77 1510.83,1505.91 v4(1520.67,1515.75) ; v1(1575,1605) 1652.56,1527.44 1652.56,1457.68 1653.95,1456.28 1653.95,1451.36 v1(1656.21,1449.1) ; v1@1658.67,1451.56 1806.1,1304.13 1825.79,1304.13 1840.55,1318.9 1840.55,1363.19 1909.45,1432.09 ; 1943.9,1668.31 1943.9,1466.54 1909.45,1432.09 ; 1978.35,1550.2 1978.35,1387.8 1948.82,1358.27 1948.82,1353.35 1938.98,1343.5 1924.21,1343.5 1909.45,1358.27 1909.45,1432.09 ; 2374.02,1832.2 2492.13,1738.55 2507.33,1726.49 2509.96,1723.87 2509.96,1720.46 2509.12,1697.3 2509.12,1694.07 2514.76,1687.99 v4(2515.51,1687.24) ; v1(2534.6,1974.26) 2570.99,1974.26 2575.08,1978.35 2608.27,1978.35 2627.95,1958.66
  L8_BOT w7.24: J700.21@1387.8,1732.28 v1(1395.67,1744.09) J700.20@1387.8,1748.03
  L8_BOT w9.45: v1(2870,2250) 2872.77,2250 2885.37,2262.6 2917.32,2262.6 J1300.64@2918.5,2263.78
  L8_BOT w14.17: v1(1404.53,2083.46) 1406.5,2083.46 1443.9,2083.47 v1(1503.94,2081.5) ; 2402.28,1357.58 2402.28,1356.09 2408.66,1349.71 2408.66,1328.54 2410.43,1326.77 2447.83,1326.77 2448.79,1325.82 2468.77,1325.82 v1(2469.72,1324.86) ; R1308.1@2444.09,2764.76 v1(2444.09,2766.73) ; v1(2451.14,2499.8) 2462.99,2507.09 R1311.1@2464.76,2509.84 ; R1309.1@2464.76,2568.9 2463.41,2571.65 2463.41,2621.17 2466.54,2625.2 v1(2471.83,2619.49) ; v1(2503.15,2676.18) R1306.1@2503.15,2687.99 ; R1305.1@2503.15,2823.82 v1(2503.15,2825.79) ; v1(2534.6,1974.26) 2532.63,1974.26 R710.1@2529.53,1977.36 2529.53,1979.33 R1322.1@2548.23,2037.4 ; R1319.1@3035.63,2637.8 3037.6,2696.78 v1(3037.6,2696.85) R1317.1@3035.63,2696.85
  L8_BOT w15.75: v1(1387.8,1934.25) C702.1@1387.8,1936.22 ; v1(1455.51,1777.56) C703.1@1457.48,1777.56 ; v1(1455.51,1846.46) C704.1@1457.48,1846.46 ; v1(1477.36,1206.69) C206.1@1479.33,1207.87 ; v1(1501.97,2013.78) U703.5@1503.94,2013.78 ; v1(1503.94,2081.5) C705.1@1503.94,2083.46 ; v1(2677.44,728.73) 2678.51,728.73 2695.31,745.53 2747.5,745.53 U203.1@2748.03,746.06 ; v1(2695,640) 2695.75,640.75 2707.68,640.75 2738.19,671.26 U203.3@2748.03,671.26 ; v1(2742.06,591.28) 2742.06,592.06 2747.24,597.24 C227.1@2747.24,598.42 ; v1(3091.73,2288.58) C1305.1@3095.67,2262.99
  other v1: 1401.57,931.89 1618.11,933.07 1657.48,933.07 2595.04,1326.77 1512.8,1452.76 1530,1605
  other v4: 1628.94,1520.67
VDD_1V8_DBG: C1506.1 C1507.1 C1508.1 C1509.1 U1500.12 U1500.37 U1500.49 U1500.64 | length 268.3
  L1_TOP w7.87: v1(400,2290) 403.2,2290 405.52,2292.32 444.37,2292.32 U1500.12@445.37,2293.31 ; v1(495,2585) 520.67,2585 521.65,2585.98 U1500.64@521.65,2586.12 ; U1500.49@816.93,2586.12 v1(824.8,2586.14) ; v1(830,2295) 830.85,2294.15 892.36,2294.15 U1500.37@893.21,2293.31
  L4_PWR w7.87: v1@890.75,2199.8 v1@895.67,2194.88
  L8_BOT w15.75: C1507.1@374.02,2292.52 375.78,2290.75 399.25,2290.75 v1(400,2290) ; v1(495,2585) 495.75,2585.75 520.48,2585.75 C1509.1@521.65,2586.93 ; v1(824.8,2586.14) C1506.1@866.14,2587.32 ; C1508.1@892.44,2214.57 v1(894.41,2194.88)
VDD_CORE_0V85: C210.1 C211.1 C301.1 C302.1 C303.1 C304.1 C305.1 C306.1 C307.1 C312.1 C313.1 C314.1 C315.1 C316.1 C317.1 FB300.1 FB301.1 L200.2 TP304.1 TP305.1 U1.G12 U1.G13 U1.G14 U1.G15 U1.G16 U1.H12 U1.H13 U1.H14 U1.H15 U1.H16 U1.H17 U1.H18 U1.J12 U1.J13 U1.J16 U1.J17 U1.J18 U1.K12 U1.K13 U1.K16 U1.K17 U1.K18 U1.L13 U1.L14 U1.L15 U1.L17 U1.L18 U200.1 | length 1805.7
  L1_TOP w5.91: U200.1@1650.59,1145.67 v1@1673.23,1145.67 ; v2(1988.19,1751.97) U1.K12@1998.03,1761.81 ; v2(1988.19,1791.34) U1.H12@1998.03,1801.18 ; U1.J12@1998.03,1781.5 v2(2007.87,1771.65) ; U1.G12@1998.03,1820.87 v2(2007.87,1811.02) ; v2(2007.87,1732.28) U1.L13@2017.72,1742.13 ; v2(2007.87,1751.97) U1.K13@2017.72,1761.81 ; v2(2007.87,1791.34) U1.H13@2017.72,1801.18 ; U1.J13@2017.72,1781.5 v2(2027.56,1791.34) ; U1.G13@2017.72,1820.87 v2(2027.56,1811.02) ; v2(2027.56,1751.97) U1.L14@2037.4,1742.13 ; v2(2027.56,1830.71) U1.G14@2037.4,1820.87 ; U1.H14@2037.4,1801.18 v2(2047.24,1791.34) ; v2(2047.24,1732.28) U1.L15@2057.09,1742.13 ; v2(2047.24,1811.02) U1.H15@2057.09,1801.18 ; U1.G15@2057.09,1820.87 v2(2066.93,1830.71) ; v2(2066.93,1751.97) U1.K16@2076.77,1761.81 ; v2(2066.93,1791.34) U1.J16@2076.77,1781.5 ; v2(2066.93,1811.02) U1.H16@2076.77,1801.18 ; U1.G16@2076.77,1820.87 v2(2086.61,1830.71) ; v2(2086.61,1732.28) U1.L17@2096.46,1742.13 ; v2(2086.61,1771.65) U1.K17@2096.46,1761.81 ; v2(2086.61,1791.34) U1.J17@2096.46,1781.5 ; v2(2086.61,1811.02) U1.H17@2096.46,1801.18 ; v2(2106.3,1751.97) U1.K18@2116.14,1761.81 ; v2(2106.3,1771.65) U1.J18@2116.14,1781.5 ; v2(2106.3,1791.34) U1.H18@2116.14,1801.18 ; U1.L18@2116.14,1742.13 v2(2125.98,1732.28)
  L1_TOP w7.87: v1(1673.23,1141.73) v1@1673.23,1145.67
  L4_PWR w7.87: 2077.52,2190.39 2076.77,2217.89 2076.77,2224.41 2079.08,2226.72 2086.41,2236.14 cw(c2100.39,2225.27) 2087.87,2237.8 2094.15,2244.08 2096.46,2246.39 2098.03,2345.58 ccw(c2080.32,2345.86) 2097.99,2347.08 v1(2092.52,2426.38) v1@2091.54,2426.18 ; 2341.58,1402.36 2342.76,1403.54 2363.23,1403.54 2367.17,1407.48 2568.51,1407.48 2589.37,1428.35 2589.37,1449.37 v1(2590,1450)
  L5_PWR w3.54: 2249.02,1569.88 2249.02,1619.09 v2(2263.78,1633.86)
  L8_BOT w3.54: v2(2047.24,1732.28) 2062.01,1732.28 2101.38,1692.91 2101.38,1564.96 2121.06,1545.28
  L8_BOT w5.91: v2(2145.67,1614.17) 2159.45,1599.21 2218.5,1599.21
  L8_BOT w7.87: FB300.1@2101.38,1215.55 2125.98,1240.16 2125.98,1540.35 2121.06,1545.28 ; 2125.98,1259.84 FB301.1@2170.28,1215.55
  L8_BOT w15.75: C312.1@1682.28,1801.18 v1(1684.25,1801.18) ; v1(1728.42,2162.6) 1730.32,2162.6 C307.1@1732.28,2160.63 ; C306.1@1846.46,2160.63 v1(1846.46,2162.6) ; v1(2110.18,2057.01) v1(2110.18,2057.01) 2136.58,2057.05 C304.1@2136.61,2057.09 ; v1(2129.55,2160.25) C305.1@2131.89,2160.63 ; C316.1@2338.58,1365.35 2338.58,1398.3 2341.58,1401.3 2341.58,1402.36 ; 2338.58,1402.36 C314.1@2338.58,1422.05 ; C317.1@2340.55,1268.9 2341.58,1269.92 C317.1@2341.58,1270.87
  other v1: 1762.99,1001.97 1740.16,1090.55 1779.53,1090.55 1759.84,1379.13
  other v2: 1744.88,1931.1
VDD_LDO2: C217.1 TP204.1 U200.19 | length 33
  L1_TOP w6.3: 1467.52,1234.25 U200.19@1499.02,1224.41
  other v1: 1370.28,1283.46
VDD_SD_3V3: C713.1 C714.1 J702.4 U700.7 U702.5 U702.6 | length 416.4
  L1_TOP w6.3: U702.6@3094.49,2404.82 v1(3092.52,2437.68) U702.5@3094.49,2437.7
  L1_TOP w9.45: U700.7@3021.26,2372.05 v3(3023.23,2372.05)
  L1_TOP w15.75: C713.1@3170.67,2338.58 v1(3172.64,2338.58) ; v1(3260.04,2562.99) J702.4@3260.04,2564.96 ; v1(3360,2280) 3360,2281.07 3366.34,2287.4 3366.34,2306.3 C714.1@3369.09,2309.05
  L5_PWR w7.87: v3@3021.65,2372.05 2942.91,2450.79 2942.91,2470.47 2952.76,2480.32 3046.26,2480.32 3090.55,2436.02 3120.08,2465.55
VDD_SDIO_LDO1: C216.1 C711.1 U200.7 U700.3 | length 1999.5
  L1_TOP w5.91: C711.1@2963.78,2263.78 2963.78,2285.05 2970,2291.27 v1(2970,2295)
  L1_TOP w6.3: U200.7@1650.59,1240.16 1657.48,1240.16 1662.2,1244.88 1674.65,1244.88 1678.34,1248.57 1678.34,1267.12 v1(1680.91,1269.68)
  L1_TOP w9.45: v1(2874.21,2345) 2876.98,2345 2884.35,2352.36 U700.3@2962.99,2352.36
  L4_PWR w3.54: 2204.72,1540.35 2372.05,1707.68
  L4_PWR w7.87: v4(2170,1140) 2186.85,1266.36 ccw(c2169.29,1268.7) 2187.01,1268.82 2185.96,1425.2 2185.36,1514.46 2185.36,1520.99 2189.97,1525.6 2204.72,1540.35 ; 2372.05,1707.68 2603.35,1938.98 2603.35,1960.32 2603.35,1963.58 2607.96,1968.2 2646.44,1993.11 2652.05,1995.92 ccw(c2645,2010) 2657.55,2000.49 2711.61,2071.85 2711.61,2199.8 2854.55,2342.74 2871.95,2342.74 v1(2874.21,2345)
  L5_PWR w7.87: v1(1680.91,1269.68) 1680.91,1227.56 1771.65,1136.81 1801.18,1136.81 ; v1(2874.21,2345) 2924.21,2295 v1(2970,2295)
VDDA_1V8: C218.1 FB303.1 FB304.1 FB305.1 FB306.1 FB307.1 FB308.1 FB309.1 FB310.1 TP309.1 U200.21 | length 2474.2
  L1_TOP w6.3: U200.21@1499.02,1192.91 1504.45,1192.91 v4(1505.43,1191.93)
  L5_PWR w7.87: v1@1496.06,1102.36 1555.12,1102.36 1579.72,1126.97 ; v4(1505.43,1191.93) 1505.43,1190.33 1510.83,1184.93 1510.83,1181.1 1545.28,1181.1 1555.12,1171.26 1555.12,1151.57 1579.72,1126.97 ; 1510.83,1363.19 1545.28,1328.74 1564.96,1328.74 1643.7,1250 1643.7,1235.24 1658.46,1220.47 1663.39,1220.47 1692.91,1190.94 1692.91,1131.89 1668.31,1107.28 1599.41,1107.28 1579.72,1126.97
  L6_SIG w7.87: v1@2076.77,2253.94 2086.61,2263.78 2189.96,2263.78 2335.63,2118.11 2340.19,2113.55 2383.31,2090.65 cw(c2375,2075) 2392.68,2076.19 2393.48,2064.31 2397.88,2059.91 2427.68,2043.28 cw(c2420,2029.53) 2431.19,2040.61 2435.75,2036 2492.13,1979.01 2492.29,1978.85 2539.23,1924.39 ccw(c2551.16,1934.67) 2540.02,1923.54 2548.97,1914.59 2548.97,1908.07 2547.32,1906.42 2563.98,1889.76 2563.98,1403.29 2569.25,1398.02 2569.25,1381.98 2563.98,1376.71 2563.98,1348.43 2440.94,1225.39 2416.34,1225.39 2298.23,1343.5 2269.82,1343.5 2264.66,1338.34 2261.72,1338.34 v4(2247.18,1323.8)
  L8_BOT w15.75: v1(1497.83,1104.33) C218.1@1499.8,1104.33 ; FB303.1@1874.02,1267.72 v1(1874.02,1269.68) ; v1(1931.1,1230.32) FB308.1@1931.1,1232.28 ; FB309.1@1988.19,1232.28 v1(2041.34,1230.32) v1(2041.34,1230.32) FB307.1@2041.34,1232.28 ; FB310.1@2017.72,2253.94 2019.69,2253.38 2032.02,2253.38 ccw(c2032.02,2275.04) 2032.46,2253.39 2059.79,2253.94 2072.83,2253.94 v1(2074.8,2255.91) ; FB304.1@2230.32,1232.28 v1(2230.32,1230.32) 2230.39,1230.32 FB305.1@2285.43,1232.28
VDDA_1V8_CSI: C330.1 C331.1 FB307.2 U1.P13 | length 484.8
  L1_TOP w5.91: U1.P13@2017.72,1683.07 v2(2027.56,1673.23)
  L3_SIG w5.91: 2027.56,1543.31 v2(2027.56,1673.23)
  L3_SIG w15.75: 2027.56,1543.31 2027.56,1419.85 2045.28,1402.14 v1(2045.28,1367.32)
  L6_SIG w7.87: v1@2042.32,1269.68 2042.32,1363.19 v1@2045.87,1366.73 ; v1(2045.28,1367.32) v1@2045.28,1369.72
  L8_BOT w15.75: FB307.2@2041.34,1267.72 v1(2041.34,1269.68) ; v1(2045.28,1367.32) C331.1@2045.28,1422.05
VDDA_1V8_MCU: C322.1 C323.1 FB303.2 U1.F13 U1.N12 | length 2404.7
  L1_TOP w5.91: U1.N12@1998.03,1702.76 v2(2007.87,1692.91) ; v2(2007.87,1830.71) U1.F13@2017.72,1840.55
  L3_SIG w3.54: 1739.76,1543.31 1739.76,1680.71 1747.05,1687.99 1806.1,1747.05 1820.87,1747.05 1889.76,1678.15 1909.45,1697.83 1948.82,1697.83 1958.66,1707.68 1978.35,1707.68 1988.19,1697.83 2002.95,1697.83 v2(2007.87,1692.91)
  L3_SIG w7.87: 1739.76,1543.31 1739.76,1429.53 1744.09,1425.2 1796.26,1373.03 1796.26,1343.5 v1@1815.94,1323.82
  L6_SIG w3.54: 1720.47,1663.39 1747.05,1663.39 ; 1747.05,1687.99 1845.47,1786.42 1963.58,1786.42 v2(2007.87,1830.71)
  L6_SIG w7.87: 1720.47,1663.39 1602.36,1663.39 1550.2,1663.39 1535.43,1648.62 1535.43,1633.86 1550.2,1619.09 1550.2,1574.8 1628.94,1496.06 1628.94,1446.85 1668.31,1407.48 1668.31,1353.35 1791.34,1230.32 v1@1875,1230.32 ; 1747.05,1687.99 1747.05,1663.39 1747.05,1644.59 1737.6,1635.14 1737.6,1543.31 1737.6,1431.69 1744.09,1425.2 1796.26,1373.03 1796.26,1343.5 v1@1815.94,1323.82
  L8_BOT w7.87: C323.1@1815.94,1323.82 1840.55,1299.21 ; 1835.63,1230.32 FB303.2@1875,1230.32
  L8_BOT w15.75: v1(1816.93,1209.45) C322.1@1816.93,1231.1 ; v1(1816.93,1325.59) C323.1@1816.93,1327.56 ; v1(1874.02,1230.32) FB303.2@1874.02,1232.28
VDDA_1V8_OLDI: C334.1 C335.1 FB308.2 U1.P11 | length 548.1
  L1_TOP w5.91: v2(1968.5,1673.23) U1.P11@1978.35,1683.07
  L3_SIG w7.87: v1@1929.13,1269.68 v1@1929.13,1368.11
  L6_SIG w3.54: 1963.58,1668.31 v2(1968.5,1673.23)
  L6_SIG w7.87: v1@1929.13,1368.11 1963.58,1402.56 1963.58,1540.35 1963.58,1668.31
  L8_BOT w7.87: 1909.45,1289.37 FB308.2@1929.13,1269.68 ; 1909.45,1348.43 C334.1@1929.13,1368.11
  L8_BOT w15.75: FB308.2@1931.1,1267.72 v1(1931.1,1269.68) ; C334.1@1931.1,1365.35 v1(1931.1,1367.32) C335.1@1931.1,1422.05
VDDA_1V8_PLL0: C324.1 C325.1 FB304.2 U1.N13 | length 600.3
  L1_TOP w5.91: U1.N13@2017.72,1702.76 v2(2027.56,1712.6)
  L4_PWR w7.87: v1(2223.15,1366.07) 2225.39,1363.82 2225.39,1344.41 2229.33,1340.47 v1@2229.33,1269.68
  L6_SIG w3.54: v2(2027.56,1712.6) 2042.32,1697.83 2042.32,1550.2
  L6_SIG w7.87: 2042.32,1550.2 2052.17,1540.35 2206.71,1385.81 2206.71,1382.51 v1(2223.15,1366.07)
  L8_BOT w15.75: v1(2223.15,1366.07) C324.1@2224.41,1366.07 ; C324.1@2224.41,1365.35 C324.1@2224.41,1366.07 ; C325.1@2224.41,1422.05 C324.1@2224.41,1366.07 ; FB304.2@2230.32,1267.72 v1(2230.32,1269.68)
VDDA_1V8_PLL1: C326.1 C327.1 FB305.2 U1.N14 | length 655.6
  L1_TOP w5.91: U1.N14@2037.4,1702.76 v2(2047.24,1712.6)
  L4_PWR w7.87: v1@2283.46,1269.68 2283.46,1368.11
  L6_SIG w3.54: v2(2047.24,1712.6) 2052.17,1707.68 2052.17,1579.72
  L6_SIG w7.87: 2052.17,1579.72 2091.54,1540.35 2150.59,1481.3 2175.2,1481.3 2283.46,1373.03 2283.46,1368.11
  L8_BOT w7.87: C326.1@2283.46,1368.11 2303.15,1348.43
  L8_BOT w15.75: C326.1@2281.5,1365.35 2281.5,1367.32 C327.1@2281.5,1422.05 ; FB305.2@2285.43,1267.72 v1(2285.43,1269.68)
VDDA_1V8_PLL2: C328.1 C329.1 FB306.2 U1.F14 | length 433.2
  L1_TOP w5.91: U1.F14@2037.4,1840.55 v2(2047.24,1830.71)
  L5_PWR w3.54: v2(2047.24,1830.71) 2047.24,1996.93 2050.32,2000
  L5_PWR w7.87: 2050.32,2000 2062.15,2011.84 2062.15,2118.11 v1(2062.15,2181.57)
  L8_BOT w5.91: C329.1@1979.53,1970.47 1983.46,1988.19
  L8_BOT w15.75: v1(1960.63,2215.35) C328.1@1960.63,2217.32 ; v1(2062.15,2181.57) 2074.8,2194.22 FB306.2@2074.8,2218.5
VDDA_1V8_USB: C332.1 C333.1 FB309.2 U1.P12 | length 501.4
  L1_TOP w5.91: U1.P12@1998.03,1683.07 v2(2007.87,1673.23)
  L3_SIG w3.54: 1993.11,1658.46 v2(2007.87,1673.23)
  L3_SIG w7.87: v1(1988.19,1367.32) 1988.19,1425.2 1988.19,1481.3 1993.11,1486.22 1993.11,1540.35 1993.11,1658.46
  L6_SIG w7.87: v1(1988.19,1269.68) 1968.5,1289.37 1968.5,1348.43 v1@1988.19,1368.11
  L8_BOT w15.75: FB309.2@1988.19,1267.72 v1(1988.19,1269.68) ; C332.1@1988.19,1365.35 v1(1988.19,1367.32) C333.1@1988.19,1422.05
VDDA_2V5_PHY: C811.1 C812.1 C813.1 C814.1 C815.1 C816.1 FB800.2 U800.3 U800.9 | length 369.7
  L1_TOP w7.56: v1(2655,885) 2655.26,884.74 2655.26,862.46 U800.3@2655.51,862.2 ; U800.9@2773.62,862.2 2774.31,862.89 2774.31,884.31 v1(2775,885)
  L8_BOT w5.91: C815.1@2872.83,862.2 2872.83,864.66 2863.18,874.32 C812.1@2863.18,898.61 2883.84,898.61 2892.45,890 v1(2895,890)
  L8_BOT w7.87: v1@2618.11,900.59 v1(2617.32,901.57) 2617.36,901.34 2647.55,847.45 2653.29,841.71
  L8_BOT w15.75: C813.1@2605.51,901.58 v1(2617.32,901.57) ; FB800.2@2610.24,836.74 2650.71,836.74 ; 2652.28,836.74 cw(c2672.27,814.89) 2655.35,839.19 cw(c2672.27,814.89) 2672.27,844.5 C814.1@2686.66,844.5 ; 2653.29,841.71 2654.45,840.48 ; v1(2655,885) 2685.52,854.48 2685.52,845.64 C814.1@2691.75,839.41 ; C816.1@2774.41,862.2 2774.7,862.5 2774.7,884.7 v1(2775,885) ; v1(2851.57,685.04) C811.1@2853.54,685.04
VDDA_3P3_USB: C339.1 FB311.2 U1.N7 | length 424.4
  L1_TOP w5.91: v2(1889.76,1712.6) U1.N7@1899.61,1702.76
  L6_SIG w3.54: v2(1791.34,1594.49) 1796.26,1589.57 ; 1796.26,1569.88 1865.16,1569.88 1875,1579.72 1875,1697.83 v2(1889.76,1712.6)
  L6_SIG w7.87: 1796.26,1589.57 1796.26,1540.35 1796.26,1481.3 v1@1815.94,1461.61
  L8_BOT w3.54: v2(1791.34,1594.49) 1815.94,1569.88
  L8_BOT w5.91: C339.1@1782.68,1596.46 v2(1791.34,1594.49)
  L8_BOT w15.75: FB311.2@1816.93,1458.66 v1(1816.93,1460.63)
VDDA_3V3_AUD: C1100.1 C1101.1 C1102.1 C1103.1 C1104.1 C1105.1 C1106.1 FB1100.2 U1100.18 U1100.24 U1100.25 | length 209.4
  L1_TOP w7.87: U1100.25@3614.17,2529.53 3615,2530.35 3615,2550 3620.12,2555.12 U1100.24@3639.76,2555.12 3639.76,2582.04 3635,2586.8 v1(3635,2590) ; v1(3662.2,2687.01) 3665.14,2684.07 3665.14,2645.96 C1101.1@3666.1,2645 ; U1100.18@3757.87,2555.12 3758.86,2556.1 3758.86,2593.86 v1(3760,2595)
  L1_TOP w15.75: v1(3600.39,2711.42) C1104.1@3600.39,2713.39 ; v1(3741.34,2765.75) C1100.1@3743.31,2765.75 ; v1(3751.97,2835.63) FB1100.2@3751.97,2837.6 ; v1(3760,2595) 3760,2596.07 3765.75,2601.81 3765.75,2621.26 C1103.1@3768.5,2624.02 ; v1(3766.54,2692.91) C1105.1@3768.5,2692.91
VDDA_CORE_CSI_0V85: C310.1 C311.1 FB301.2 U1.M13 | length 683.5
  L1_TOP w5.91: U1.M13@2017.72,1722.44 v2(2027.56,1732.28)
  L6_SIG w3.54: 1993.11,1697.83 v2(2027.56,1732.28)
  L6_SIG w7.87: 1993.11,1697.83 1993.11,1540.35 2165.35,1368.11 2170.28,1363.19 v1@2170.28,1269.68
  L8_BOT w7.87: 2145.67,1294.29 FB301.2@2170.28,1269.68 ; 2145.67,1348.43 C310.1@2165.35,1368.11
  L8_BOT w15.75: C310.1@2167.32,1365.35 v1(2167.32,1367.32) C311.1@2167.32,1422.05
  other v1: 2169.29,1268.7
VDDA_CORE_USB_0V85: C308.1 C309.1 FB300.2 U1.M12 | length 668.5
  L1_TOP w5.91: v2(1988.19,1732.28) U1.M12@1998.03,1722.44
  L3_SIG w3.54: v2(1988.19,1732.28) 2022.64,1697.83 2052.17,1697.83
  L3_SIG w7.87: 2052.17,1697.83 2052.17,1540.35 2052.17,1425.2 2102.36,1367.32 v1(2104.46,1367.32)
  L6_SIG w7.87: v1@2101.38,1269.68 2081.69,1289.37 2081.69,1348.43 2090,1356.73 2090.67,1356.73 2101.26,1367.32 v1(2104.46,1367.32)
  L8_BOT w7.87: 2066.93,1304.13 FB300.2@2101.38,1269.68
  L8_BOT w15.75: C308.1@2102.36,1365.35 C308.1@2102.36,1367.32 ; C309.1@2102.36,1422.05 C308.1@2102.36,1367.32 ; v1(2104.46,1367.32) C308.1@2102.36,1367.32
  other v1: 2102.36,1268.7
VDDS_DDR_1V2: C214.1 C215.1 C318.1 C319.1 C320.1 L202.2 TP306.1 U1.K10 U1.K11 U1.L9 U1.L10 U1.L11 U1.M8 U1.M9 U1.M10 U1.N8 U1.N9 U200.24 | length 486.8
  L1_TOP w5.91: v2(1909.45,1712.6) U1.N8@1919.29,1702.76 ; U1.M8@1919.29,1722.44 v2(1929.13,1732.28) ; v2(1929.13,1712.6) U1.N9@1938.98,1702.76 ; U1.M9@1938.98,1722.44 v2(1948.82,1732.28) ; U1.L9@1938.98,1742.13 v2(1948.82,1751.97) ; v2(1948.82,1712.6) U1.M10@1958.66,1722.44 ; U1.L10@1958.66,1742.13 v2(1968.5,1751.97) ; U1.K10@1958.66,1761.81 v2(1968.5,1771.65) ; v2(1968.5,1732.28) U1.L11@1978.35,1742.13 ; U1.K11@1978.35,1761.81 v2(1988.19,1771.65)
  L1_TOP w7.87: v1(1257.87,952.76) 1257.87,955.95 1267.72,965.79 v1(1267.72,1005.12) ; v1(1499.02,1141.73) U200.24@1499.02,1145.67
  L4_PWR w7.87: v1@1259.84,954.72 1294.29,954.72 ; v1@1269.68,1003.94 1294.29,1028.54 ; v1@1289.37,703.74 1289.37,772.64 1318.9,802.17 1318.9,880.91
  L5_PWR w3.54: v2(1968.5,1771.65) v2(1988.19,1771.65)
  L8_BOT w5.91: C318.1@1782.68,1655.51 v2(1791.34,1653.54)
  other v1: 1287.4,703.54 1484.25,933.07 1575,1480 1605,1480
  other v2: 1811.02,1732.28
VDDS_OSC0_1V8: C600.1 C601.1 C604.1 FB310.2 R601.1 R605.1 TP310.1 U1.D15 U600.4 U601.5 | length 2058.6
  L1_TOP w5.91: U1.D15@2057.09,1879.92 v2(2066.93,1870.08)
  L1_TOP w14.17: v1(1359.25,1629.92) R605.1@1363.19,1629.92 ; v1(1568.9,1985.24) R601.1@1578.74,1985.24
  L1_TOP w15.75: v1(1568.9,1985.24) 1569.65,1985.99 1569.65,2010.6 1602.17,2043.11 v1(1605.32,2043.11) ; U600.4@1674.21,1916.34 v1(1674.21,1918.31) ; v1(1674.21,2043.11) C600.1@1674.21,2045.08
  L5_PWR w7.87: v1@1284.45,1299.21 1343.5,1358.27 1343.5,1614.17 1358.27,1628.94 1358.27,1781.5 1466.54,1889.76 1599.41,1889.76 ; v1@1569.88,1983.27 1594.49,2007.87 1594.49,1894.68 1599.41,1889.76 ; v1@1673.23,1919.29 1673.23,1865.16 1658.46,1850.39 1638.78,1850.39 1599.41,1889.76
  L6_SIG w3.54: 1754.13,1965.75 2050,1965.75 2052.17,1963.58 ; 2065.75,2000 2065.75,1991.84 2052.17,1978.26 2052.17,1963.58 ; v2(2066.93,1870.08) 2052.17,1884.84 2052.17,1963.58
  L6_SIG w7.87: v1@1604.33,2042.32 v1@1673.23,2042.32 ; v1@1673.23,1919.29 1707.68,1919.29 1717.52,1929.13 1754.13,1965.75 ; v1(2018.7,2185.83) 2053.91,2150.61 2053.91,2143.36 2056.14,2141.14 2060.75,2136.52 2060.75,2130 2060.75,2128.73 2060.69,2128.67 2060.03,2120.82 2060.03,2118.11 2060.03,2114.86 2065.75,2107.48 2065.75,2000
  L8_BOT w15.75: FB310.2@2017.72,2218.5 2018.21,2218.01 2018.21,2186.32 v1(2018.7,2185.83)
  other v1: 1283.46,1300